# Altium PCB EEM_FMC_Carrier.PcbDoc (part 9 of 19)
Units mm, origin at the board's own origin, x right, y up, seen from the top; angles counter-clockwise.
Board outline 222.9 x 100 mm, 6 copper layers (TopLayer, MidLayer1, MidLayer2, SignalLayer1, Internal Plane 1, BottomLayer), stack 1.528 mm thick; 790 components, 743 nets, 3570 pads, 2277 vias.
Unrouted connection lines stored in the file: 3.
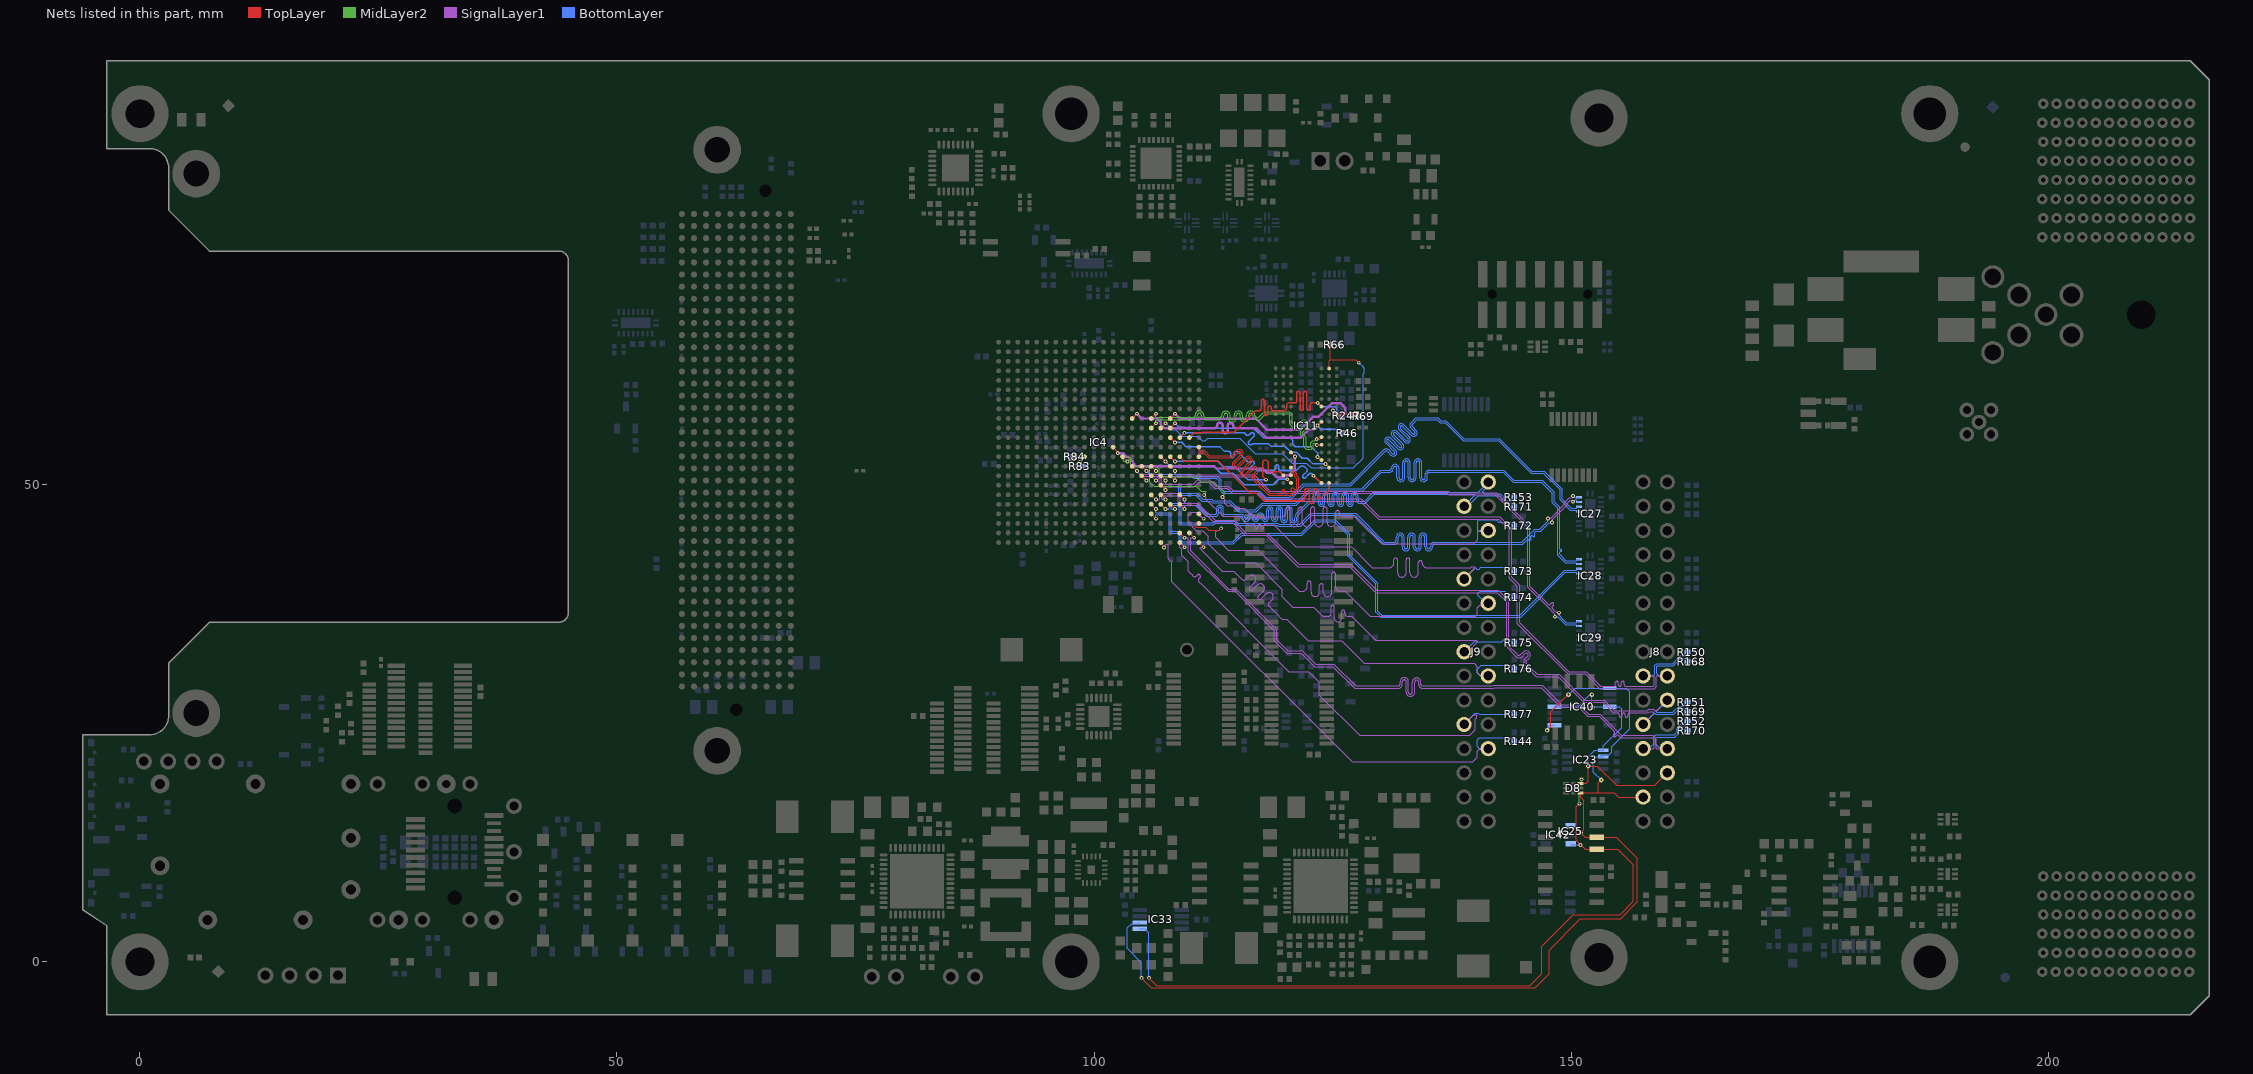
[diagram p11: the nets of this part, all layers, seen from the top]

## Via types
v1: diameter 0.4, hole 0.2, TopLayer to BottomLayer, tented both sides, 1032 vias
v2: diameter 0.5, hole 0.2, TopLayer to BottomLayer, tented both sides, 979 vias
v3: diameter 0.5, hole 0.2, TopLayer to BottomLayer, 162 vias
v4: diameter 0.8, hole 0.5, TopLayer to BottomLayer, tented both sides, 102 vias
v5: diameter 0.6, hole 0.3, TopLayer to BottomLayer, tented both sides, 2 vias

## Nets (pads, with @x,y where several pads share a name; then routed paths per layer and width w, separated by ;. In a path a pad name is that pad's centre, name@x,y a point inside that pad or via, vN(x,y) a via of type N, cw(c..) or ccw(c..) an arc to the next point about the centre after c; other vN are vias at no path point) (continued)
DDR3_DQ11: IC4.L20 IC11.C2 | length 19.1
  TopLayer w0.16: IC4.L20@108.998,54.95 v1(109.498,55.45) ; v1(124.251,52.185) 124.263,52.185 IC11.C2@124.648,51.8
  BottomLayer w0.16: v1(109.498,55.45) 114.9,55.45 115.75,55.45 115.951,55.249 ccw(c116.113,55.412) 116.276,55.249 116.428,55.401 cw(c116.59,55.238) 116.753,55.401 cw(c116.59,55.238) 116.753,55.075 116.251,54.574 ccw(c116.414,54.411) 116.251,54.249 ccw(c116.414,54.411) 116.577,54.249 cw(c116.794,53.922) 116.817,54.314 117.039,54.301 ccw(c117.063,54.693) 117.063,54.3 117.657,54.3 118.292,54.3 118.54,54.051 119.997,54.051 120.623,53.425 121.198,53.425 121.83,52.793 122.357,52.793 122.965,52.185 v1(124.251,52.185)
DDR3_DQ12: IC4.N18 IC11.A7 | length 15.3
  TopLayer w0.16: IC4.N18@106.998,52.95 v1(107.498,52.45) ; v1@120.263,50.585 IC11.A7@120.648,50.2
  BottomLayer w0.16: v1(107.498,52.45) 108.072,51.876 112.622,51.876 113.291,51.207 114.566,51.207 115.773,50 118.773,50 119.358,50.585 v1(120.251,50.585)
DDR3_DQ13: IC4.N20 IC11.A2 | length 23.2
  TopLayer w0.16: IC4.N20@108.998,52.95 109.498,52.45 113.075,52.45 116.425,49.1 117.125,49.1 117.9,48.325 121.775,48.325 121.855,48.325 ccw(c121.855,48.555) 122.085,48.555 122.085,49.383 cw(c122.315,49.383) 122.545,49.383 122.545,48.269 ccw(c122.775,48.269) 123.005,48.269 123.005,49.337 cw(c123.235,49.337) 123.465,49.337 123.465,48.82 ccw(c123.695,48.82) 123.858,48.658 124.3,49.1 124.648,49.448 IC11.A2@124.648,50.2
DDR3_DQ14: IC4.N19 IC11.B8 | length 16.4
  TopLayer w0.16: IC4.N19@107.998,52.95 v1(108.498,52.45) ; v1(118.033,50.538) 117.7,50.871 117.7,52.456 117.794,52.55 118.125,52.55 118.2,52.475 118.249,52.426 118.249,51.576 118.456,51.369 119.479,51.369 IC11.B8@119.848,51
  BottomLayer w0.16: v1(108.498,52.45) 112.973,52.45 113.548,51.875 114.798,51.875 116.135,50.538 v1(118.033,50.538)
DDR3_DQ15: IC4.L19 IC11.A3 | length 22.7
  TopLayer w0.16: IC4.L19@107.998,54.95 v1(108.498,54.45) ; v1(123.023,50.95) 123.659,50.314 123.669,50.314 123.783,50.2 IC11.A3@123.848,50.2
  BottomLayer w0.16: v1(108.498,54.45) 109.198,54.45 109.681,53.967 113.206,53.967 113.673,53.5 113.703,53.5 114.143,53.5 cw(c114.143,53.32) 114.323,53.32 114.323,53.035 ccw(c114.503,53.035) 114.683,53.035 114.683,53.32 cw(c114.863,53.32) 114.863,53.5 115.048,53.5 115.147,53.401 116.127,52.421 116.183,52.365 ccw(c116.311,52.492) 116.438,52.365 116.503,52.43 cw(c116.63,52.303) 116.758,52.43 cw(c116.63,52.303) 116.758,52.175 116.438,51.856 ccw(c116.565,51.728) 116.438,51.601 ccw(c116.565,51.728) 116.692,51.601 cw(c116.82,51.474) 116.947,51.601 117.048,51.5 117.226,51.5 118.75,51.5 118.83,51.5 ccw(c118.83,51.68) 119.01,51.68 119.01,51.908 cw(c119.19,51.908) 119.37,51.908 119.37,51.68 ccw(c119.55,51.68) 119.55,51.5 120.105,51.5 121.2,51.5 121.625,51.925 121.955,51.925 122.048,51.925 122.313,51.66 cw(c122.185,51.533) 122.313,51.406 121.918,51.011 ccw(c122.045,50.883) 121.918,50.756 ccw(c122.045,50.883) 122.172,50.756 122.567,51.151 cw(c122.695,51.024) 122.822,51.151 v1(123.023,50.95)
DDR3_LDM: IC4.M13 IC11.E7 | length 22.8
  TopLayer w0.16: IC4.M13@101.998,53.95 102.444,53.504 102.444,53.385 v1(102.489,53.34) ; IC11.E7@120.648,53.4 v1(121.073,52.975)
  SignalLayer1 w0.26: v1(102.489,53.34) 102.514,53.315 103.053,53.315 103.423,52.945 103.583,52.945 104.088,52.44 104.088,52.28 104.418,51.95 112.598,51.95 112.838,51.71 115.923,51.71 117.675,51.71 118.141,51.244 118.686,51.244 119.13,50.8 119.886,50.8 120.082,50.995 120.363,50.995 121.048,51.68 121.048,52.95 v1(121.073,52.975)
DDR3_LDQS_N: IC4.J17 IC11.G3 | length 27.9
  TopLayer w0.085: IC4.J17@105.998,56.95 v1(106.498,57.45) ; v1(123.349,54.798) 123.646,54.798 IC11.G3@123.848,55
  MidLayer2 w0.11: v1(106.498,57.45) 106.498,57.133 106.562,57.069 110.225,57.069 110.399,57.069 ccw(c110.399,57.274) 110.604,57.274 110.604,57.304 cw(c111.046,57.304) 111.046,57.746 cw(c111.046,57.304) 111.488,57.304 111.488,57.274 ccw(c111.693,57.274) 111.693,57.069 112.4,57.069 113.012,57.069 113.185,57.069 ccw(c113.185,57.274) 113.39,57.274 113.39,57.285 cw(c113.832,57.285) 113.832,57.727 cw(c113.832,57.285) 114.274,57.285 114.274,57.033 ccw(c114.479,57.033) 114.479,56.828 ccw(c114.479,57.033) 114.684,57.033 114.684,57.285 cw(c115.126,57.285) 115.126,57.727 cw(c115.126,57.285) 115.568,57.285 115.568,57.033 ccw(c115.773,57.033) 115.773,56.828 ccw(c115.773,57.033) 115.978,57.033 115.978,57.299 cw(c116.42,57.299) 116.42,57.741 cw(c116.42,57.299) 116.862,57.299 116.862,57.274 ccw(c117.067,57.274) 117.067,57.069 117.269,57.069 117.783,57.583 117.862,57.662 120.448,57.662 120.762,57.348 120.762,56.491 120.786,56.467 120.786,56.414 120.875,56.325 120.963,56.237 120.998,56.202 ccw(c121.143,56.347) 121.288,56.202 121.728,56.643 cw(c122.04,56.33) 122.353,56.643 cw(c122.04,56.33) 122.353,56.017 121.913,55.577 ccw(c122.058,55.432) 121.913,55.287 122.22,54.98 122.237,54.963 122.237,54.822 122.237,54.075 122.337,53.975 122.675,53.975 122.739,54.039 122.739,54.403 122.943,54.607 123.139,54.607 123.33,54.798 v1(123.349,54.798)
DDR3_LDQS_P: IC4.K17 IC11.F3 | length 27.9
  TopLayer w0.085: IC4.K17@105.998,55.95 v1(106.498,56.45) ; v1(123.353,54.178) 123.375,54.2 IC11.F3@123.848,54.2
  MidLayer2 w0.11: v1(106.498,56.45) 106.498,56.767 106.562,56.832 110.225,56.832 110.399,56.832 ccw(c110.399,57.274) 110.841,57.274 110.841,57.304 cw(c111.046,57.304) 111.046,57.509 cw(c111.046,57.304) 111.251,57.304 111.251,57.274 ccw(c111.693,57.274) 111.693,56.832 112.4,56.832 113.012,56.832 113.185,56.832 ccw(c113.185,57.274) 113.627,57.274 113.627,57.285 cw(c113.832,57.285) 113.832,57.49 cw(c113.832,57.285) 114.037,57.285 114.037,57.033 ccw(c114.479,57.033) 114.479,56.591 ccw(c114.479,57.033) 114.921,57.033 114.921,57.285 cw(c115.126,57.285) 115.126,57.49 cw(c115.126,57.285) 115.331,57.285 115.331,57.033 ccw(c115.773,57.033) 115.773,56.591 ccw(c115.773,57.033) 116.215,57.033 116.215,57.299 cw(c116.42,57.299) 116.42,57.504 cw(c116.42,57.299) 116.625,57.299 116.625,57.274 ccw(c117.067,57.274) 117.067,56.832 117.367,56.832 117.783,57.248 117.96,57.425 120.35,57.425 120.525,57.25 120.525,56.393 120.549,56.369 120.549,56.316 120.707,56.157 120.795,56.069 120.83,56.035 ccw(c121.143,56.347) 121.455,56.035 121.895,56.475 cw(c122.04,56.33) 122.185,56.475 cw(c122.04,56.33) 122.185,56.185 121.745,55.745 ccw(c122.058,55.432) 121.745,55.12 122,54.865 122,54.585 122,53.977 122.239,53.738 122.773,53.738 122.976,53.941 122.976,54.305 123.041,54.37 123.143,54.37 123.335,54.178 v1(123.353,54.178)
DDR3_ODT: IC4.J19 IC11.K1 R69.2 | length 25.8
  TopLayer w0.16: IC4.J19@107.998,56.95 v1(108.498,57.45) ; v1@125.063,57.785 IC11.K1@125.448,57.4 127.578,57.4 R69.2@127.778,57.2
  SignalLayer1 w0.26: v1(108.498,57.45) 109.023,56.925 116.973,56.925 118.149,55.749 121.612,55.749 122.975,57.113 123.509,57.113 124.921,58.525 125.879,58.525 126.314,58.09 126.314,57.455 125.959,57.1 125.737,57.1 v1(125.051,57.785)
DDR3_RAS_N: IC4.J15 IC11.J3 R46.1 | length 27.3
  TopLayer w0.16: IC4.J15@103.998,56.95 v1(104.498,57.45) ; v1(123.423,56.2) 123.448,56.2 IC11.J3@123.848,56.6
  SignalLayer1 w0.26: v1(104.498,57.45) 104.998,56.95 106.598,56.95 106.998,56.55 106.998,56.325 107.398,55.925 112.5,55.925 112.63,55.925 ccw(c112.63,56.205) 112.91,56.205 112.91,56.244 cw(c113.19,56.244) 113.47,56.244 113.47,55.689 ccw(c113.75,55.689) 114.03,55.689 114.03,56.205 cw(c114.31,56.205) 114.59,56.205 ccw(c114.87,56.205) 114.87,55.925 115.328,55.925 117.05,55.925 118.06,54.915 121.333,54.915 121.353,54.935 121.671,54.935 122.48,55.744 122.967,55.744 123.419,56.196 v1@123.419,56.236
  BottomLayer w0.16: v1(123.423,56.2) 123.823,55.8 125.678,55.8 125.826,55.652 125.846,55.652 126.053,55.445 R46.1@126.053,55.425
DDR3_RESET_N: IC4.K18 IC11.T2 R66.2 | length 39.9
  TopLayer w0.125: IC4.K18@106.998,55.95 v1(107.498,56.45) ; IC11.T2@124.648,62.2 124.648,62.982 124.778,63.112 ; R66.2@124.778,64.7 124.778,63.112 ; v1(127.748,62.8) 127.436,63.112 124.778,63.112
  BottomLayer w0.125: v1(107.498,56.45) 108.186,55.763 108.56,55.763 109.248,55.075 110.876,55.075 111.352,54.599 111.644,54.599 111.92,54.875 115.298,54.875 116.909,53.264 119.809,53.264 120.797,52.277 122.272,52.277 122.773,51.775 127.187,51.775 128.198,52.786 128.198,61.62 128.325,61.747 128.325,62.203 128.198,62.33 128.198,62.35 v1(127.748,62.8)
DDR3_UDM: IC4.K19 IC11.D3 | length 18.1
  TopLayer w0.16: IC4.K19@107.998,55.95 v1(108.498,56.45) ; v1(123.438,52.908) 123.489,52.908 123.797,52.6 IC11.D3@123.848,52.6
  BottomLayer w0.16: v1(108.498,56.45) 108.898,56.05 109.575,56.05 109.7,55.925 112.498,55.925 116.75,55.925 117.76,54.915 120.56,54.915 120.85,54.625 120.85,54.25 121.1,54 122.775,54 123.438,53.337 v1(123.438,52.908)
DDR3_UDQS_N: IC4.M22 IC11.B7 | length 23.7
  TopLayer w0.085: IC4.M22@110.998,53.95 110.998,53.606 111.048,53.556 111.594,53.556 112.101,53.049 114.149,53.049 114.252,53.049 ccw(c114.253,53.452) 114.538,53.167 114.978,53.607 114.982,53.607 cw(c115.233,53.29) 115.519,53.576 cw(c115.233,53.29) 115.52,53.005 114.762,52.247 ; 114.761,52.246 ccw(c114.897,52.11) 114.761,51.974 ccw(c114.897,52.11) 115.033,51.974 115.958,52.898 115.962,52.898 cw(c116.213,52.581) 116.499,52.867 cw(c116.213,52.581) 116.5,52.296 115.606,51.402 ; 115.606,51.402 ccw(c115.742,51.266) 115.605,51.129 ccw(c115.742,51.266) 115.878,51.129 116.537,51.788 cw(c116.823,51.502) 117.109,51.788 cw(c116.823,51.502) 117.11,51.217 116.832,50.94 ccw(c116.968,50.804) 116.832,50.668 117.103,50.397 117.177,50.323 118.4,49.1 119.525,49.1 119.568,49.1 ccw(c119.568,49.242) 119.71,49.242 119.71,49.349 cw(c119.853,49.349) 119.853,49.492 cw(c119.853,49.349) 119.995,49.349 119.995,49.242 ccw(c120.138,49.242) 120.138,49.1 120.394,49.1 120.525,49.1 120.75,49.1 120.768,49.118 ccw(c120.668,49.219) 120.768,49.32 120.669,49.42 cw(c120.769,49.52) 120.669,49.621 cw(c120.769,49.52) 120.87,49.621 120.97,49.521 ccw(c121.071,49.622) 121.171,49.521 121.25,49.6 121.25,49.74 121.25,50.648 121.061,50.838 121.061,51.056 120.823,51.294 120.752,51.294 120.702,51.244 120.702,51.054 IC11.B7@120.648,51
DDR3_UDQS_P: IC4.N22 IC11.C7 | length 23.2
  TopLayer w0.085: IC4.N22@110.998,52.95 110.998,53.294 111.048,53.344 111.506,53.344 112.013,52.837 113.937,52.837 114.252,52.837 ccw(c114.253,53.452) 114.687,53.016 115.096,53.425 ; 115.097,53.426 cw(c115.233,53.29) 115.369,53.426 cw(c115.233,53.29) 115.369,53.153 114.58,52.365 114.58,52.361 ccw(c114.897,52.11) 114.611,51.824 ccw(c114.897,52.11) 115.183,51.824 ; 115.183,51.824 116.076,52.716 ; 116.077,52.717 cw(c116.213,52.581) 116.349,52.717 cw(c116.213,52.581) 116.349,52.445 115.425,51.521 115.425,51.517 ccw(c115.742,51.266) 116.028,50.98 116.686,51.638 cw(c116.823,51.502) 116.959,51.638 cw(c116.823,51.502) 116.959,51.366 116.682,51.09 ccw(c116.968,50.804) 116.683,50.517 ; 116.683,50.517 116.953,50.247 117.027,50.173 118.312,48.888 120.838,48.888 121.462,49.512 121.462,50.736 121.273,50.925 121.273,51.144 120.91,51.506 120.752,51.506 120.702,51.556 120.702,51.746 IC11.C7@120.648,51.8
DDR3_WE_N: IC4.L21 IC11.L3 R247.1 | length 29.9
  TopLayer w0.16: IC4.L21@109.998,54.95 110.498,55.45 111.3,55.45 111.378,55.528 114.703,55.528 116.95,57.775 117.25,57.775 117.33,57.775 ccw(c117.33,57.955) 117.51,57.955 117.51,58.784 cw(c117.69,58.784) 117.87,58.784 117.87,57.444 ccw(c118.05,57.444) 118.23,57.444 118.23,58.076 cw(c118.41,58.076) 118.59,58.076 118.59,57.955 ccw(c118.77,57.955) 118.77,57.775 119.041,57.775 120.025,57.775 120.175,57.925 120.175,58.005 120.217,58.047 120.217,58.458 120.344,58.585 120.975,58.585 121.055,58.585 ccw(c121.055,58.765) 121.235,58.765 121.235,59.617 cw(c121.415,59.617) 121.595,59.617 121.595,57.984 ccw(c121.775,57.984) 121.955,57.984 121.955,59.617 cw(c122.135,59.617) 122.315,59.617 122.315,58.003 ccw(c122.495,58.003) 122.675,58.003 122.675,58.405 cw(c122.855,58.405) 122.855,58.585 123.264,58.585 v1(123.451,58.585) 123.457,58.585 123.842,58.2 IC11.L3@123.848,58.2
  BottomLayer w0.16: v1(123.451,58.585) 123.862,58.175 125.273,58.175 125.423,58.025 125.423,57.94 ; 125.424,57.94 125.424,57.874 126.028,57.27 R247.1@126.028,57.25
DXN_0: IC4.N9 R84.2 | length 1.3
  TopLayer w0.125: v1(97.498,52.45) IC4.N9@97.998,52.95
  BottomLayer w0.125: v1(97.498,52.45) 97.501,52.453 97.501,52.802 97.648,52.95 R84.2@97.668,52.95
DXP_0: IC4.N10 R83.2 | length 1.3
  TopLayer w0.125: v1(98.547,52.426) 98.547,52.462 98.998,52.913 IC4.N10@98.998,52.95
  BottomLayer w0.125: v1(98.547,52.426) 98.547,52.351 98.66,52.238 98.66,52.098 98.808,51.95 R83.2@98.828,51.95
EEM0_I2C.SCL: D8.1 IC23.6 IC25.6 IC33.2 IC40.1 IC40.8 IC42.1 J8.27 | length 115.6
  TopLayer w0.125: v1(104.975,-1.675) 106.024,-2.724 146.251,-2.724 147.7,-1.275 147.7,1.225 150.988,4.513 155.188,4.513 156.95,6.275 156.95,10.85 154.735,13.065 IC25.6@152.698,13.065 152.665,13.032 151.503,13.032 151.048,13.487 v1(151.048,13.537) 151.357,13.846 151.357,16.875 151.008,17.224 D8.1@151.008,17.7 152.873,17.7 ; v2(147.5,24.263) 147.513,24.263 147.883,24.633 147.883,26.201 149.682,28 v2(149.75,28) ; v2(153.171,19.071) 152.878,18.778 152.878,18.595 152.873,18.589 152.873,17.7 ; J8.27@157.544,17.228 154.997,17.228 154.525,17.7 152.873,17.7
  BottomLayer w0.125: IC33.2@104.798,4.125 104.664,3.991 103.941,3.991 103.5,3.55 103.5,1.398 104.975,-0.077 v1(104.975,-1.675) ; v2(147.5,24.263) 147.5,24.351 147.592,24.443 147.592,24.634 147.754,24.796 IC40.8@148.254,24.796 ; v2(149.75,28) 150.446,28.696 IC40.1@154.054,28.696 155.758,28.696 156.133,28.321 156.133,24.433 154.25,22.55 154.25,21.952 153.961,21.662 153.185,21.662 IC23.6@153.032,21.509 ; IC42.1@149.95,14.275 150.187,14.038 150.547,14.038 v1(151.048,13.537) ; v2(153.171,19.071) 152.35,19.893 152.35,21.275 152.584,21.509 IC23.6@153.032,21.509 ; IC23.6@153.398,21.525 153.382,21.509 IC23.6@153.032,21.509
EEM0_I2C.SDA: D8.3 IC23.5 IC25.5 IC33.1 IC40.4 IC40.11 IC42.3 J8.26 | length 110.3
  TopLayer w0.125: v1(105.75,-1.675) 106.575,-2.5 145.7,-2.5 146.925,-1.275 146.925,1.625 150.25,4.95 155.15,4.95 156.525,6.325 156.525,10.173 154.922,11.775 IC25.5@152.726,11.775 ; v1(150.875,16.575) 150.573,16.273 150.573,12.722 v1@150.96,12.335 ; D8.3@151.008,18.7 151.161,18.7 151.1,18.76 v1(151.1,19.128) ; v1@151.022,12.273 151.5,11.795 IC25.5@152.698,11.795 ; D8.3@151.172,18.696 151.571,18.696 151.8,18.925 v2(151.8,20.525) 152.75,20.525 154.775,18.5 158.791,18.5 J8.26@160.098,19.807 ; v2(152.183,28) 152.183,26.718 v2(152.237,26.664)
  MidLayer2 w0.125: v1(150.875,16.575) 150.875,18.155 151.094,18.374 v1@151.094,19.122
  BottomLayer w0.125: IC33.1@104.798,3.475 105.323,3.475 105.485,3.313 105.485,3.29 105.75,3.025 v1(105.75,-1.675) ; IC40.11@148.254,26.746 150.746,26.746 151.928,27.928 152.111,27.928 v2(152.183,28) ; IC42.3@149.95,12.375 150.075,12.25 v1(151,12.25) ; v2(151.8,20.525) 151.8,21.475 152.5,22.175 IC23.5@153.398,22.175 153.398,22.623 155.295,24.52 155.295,26.505 155.054,26.746 IC40.4@154.054,26.746 154.051,26.75 152.51,26.75 152.496,26.736 152.309,26.736 v2(152.237,26.664)
EEM_IO.LVDS_N0: IC4.V19 IC27.18 | length 58.9
  TopLayer w0.085: IC4.V19@107.998,47.95 v1(108.498,47.45)
  SignalLayer1 w0.11: v1(147.998,46.05) 148.018,46.07 148.018,46.326 149.587,47.896 149.587,48.059 149.922,48.394 150.014,48.394 150.183,48.225 v1(150.223,48.225)
  BottomLayer w0.085: v1(108.498,47.45) 108.154,47.45 108.104,47.5 108.104,47.636 108.318,47.85 108.7,47.85 108.913,47.637 108.913,46.062 109.175,45.8 112.55,45.8 112.725,45.975 114.825,45.975 115.019,45.782 119.194,45.782 119.337,45.638 121.663,45.638 122.825,46.8 127.325,46.8 130.35,43.775 131.35,43.775 131.499,43.775 ccw(c131.499,44.18) 131.903,44.18 131.903,44.518 cw(c132.096,44.518) 132.096,44.711 cw(c132.096,44.518) 132.288,44.518 132.288,43.481 ccw(c132.693,43.481) 132.693,43.077 ccw(c132.693,43.481) 133.097,43.481 133.097,44.518 cw(c133.29,44.518) 133.29,44.711 cw(c133.29,44.518) 133.482,44.518 133.482,43.481 ccw(c133.887,43.481) 133.887,43.077 ccw(c133.887,43.481) 134.291,43.481 134.291,44.518 cw(c134.484,44.518) 134.484,44.711 cw(c134.484,44.518) 134.676,44.518 134.676,43.497 ccw(c135.081,43.497) 135.081,43.092 ccw(c135.081,43.497) 135.485,43.497 135.485,43.583 cw(c135.678,43.583) 135.678,43.775 136.455,43.775 144.937,43.775 145.142,43.98 145.373,44.211 cw(c145.474,44.111) 145.575,44.211 145.585,44.201 ccw(c145.686,44.302) 145.786,44.201 ccw(c145.686,44.302) 145.786,44.403 145.776,44.413 cw(c145.877,44.514) 145.776,44.614 cw(c145.877,44.514) 145.978,44.614 ccw(c146.079,44.715) 146.179,44.614 ccw(c146.079,44.715) 146.179,44.816 cw(c146.28,44.917) 146.179,45.017 146.3,45.138 146.337,45.138 146.812,45.138 147.611,45.938 147.72,46.047 147.995,46.047 v1(147.998,46.05) ; v1(150.223,48.225) 150.228,48.225 150.422,48.419 150.498,48.419 150.59,48.326 150.59,48.282 150.673,48.2 IC27.18@150.848,48.2
EEM_IO.LVDS_N1: IC4.R17 IC27.16 | length 67.1
  TopLayer w0.085: IC4.R17@105.998,50.95 v1(106.498,50.45)
  BottomLayer w0.085: v1(106.498,50.45) 106.108,50.84 106.108,50.91 106.158,50.96 106.228,50.96 106.31,50.878 110.247,50.878 110.275,50.85 110.375,50.75 110.437,50.688 112.837,50.688 113.113,50.412 113.113,49.524 113.506,49.132 117.269,49.132 117.912,48.488 120.613,48.488 122.038,49.913 126.938,49.913 130.066,53.041 130.534,53.509 cw(c130.634,53.408) 130.735,53.509 131.126,53.118 ccw(c131.376,53.369) 131.627,53.118 ; 131.618,55.437 132.565,54.49 ccw(c132.817,54.74) 133.068,54.489 ; 131.618,55.437 ccw(c131.517,55.337) 131.416,55.438 ccw(c131.517,55.337) 131.416,55.236 132.396,54.256 132.396,54.252 cw(c132.114,54.037) 132.366,53.787 ; 131.628,53.119 ccw(c131.376,53.369) 131.627,53.619 131.152,54.094 130.713,54.533 cw(c130.814,54.634) 130.713,54.735 cw(c130.814,54.634) 130.915,54.735 131.863,53.787 ccw(c132.114,54.037) 132.365,53.786 ; 132.32,56.14 ccw(c132.22,56.04) 132.119,56.14 ccw(c132.22,56.04) 132.119,55.939 133.099,54.959 133.099,54.955 cw(c132.817,54.74) 133.068,54.49 ; 132.321,56.14 133.268,55.192 ccw(c133.52,55.442) 133.77,55.192 ; 133.771,55.193 ccw(c133.52,55.442) 133.801,55.658 133.801,55.662 133.345,56.118 cw(c133.446,56.219) 133.345,56.32 133.45,56.425 133.838,56.813 135.987,56.813 136.275,56.525 136.8,56.525 137.625,55.7 138.687,54.638 142.4,54.638 145.819,51.219 147.106,51.219 148.863,49.462 148.863,48.418 149.937,47.344 150.541,47.344 150.59,47.294 150.59,47.282 150.673,47.2 IC27.16@150.848,47.2
EEM_IO.LVDS_N2: IC4.T18 IC28.18 | length 65.1
  TopLayer w0.085: IC4.T18@106.998,49.95 v1(107.498,49.45)
  BottomLayer w0.085: v1(107.498,49.45) 107.498,49.794 107.548,49.844 108.694,49.844 108.888,49.65 108.888,49.137 109.119,48.906 110.669,48.906 111.294,48.282 112.244,48.282 112.4,48.125 114.2,48.125 115.162,47.163 117.013,47.163 117.713,47.863 121.213,47.863 122.725,49.375 128.175,49.375 129.99,51.19 130.129,51.329 130.968,51.329 ccw(c130.968,51.733) 131.372,51.733 cw(c131.565,51.733) 131.565,51.926 cw(c131.565,51.733) 131.757,51.733 131.757,50.739 ccw(c132.162,50.739) 132.162,50.334 ccw(c132.162,50.739) 132.566,50.739 132.566,52.306 cw(c132.759,52.306) 132.759,52.498 cw(c132.759,52.306) 132.951,52.306 132.951,50.739 ccw(c133.356,50.739) 133.356,50.334 ccw(c133.356,50.739) 133.76,50.739 133.76,52.306 cw(c133.953,52.306) 133.953,52.498 cw(c133.953,52.306) 134.145,52.306 134.145,50.739 ccw(c134.55,50.739) 134.55,50.334 ccw(c134.55,50.739) 134.954,50.739 134.954,51.136 cw(c135.147,51.136) 135.147,51.329 135.295,51.329 142.872,51.329 143.925,50.275 146.888,50.275 148.038,49.125 148.038,48.112 148.613,47.537 148.613,42.612 149.381,41.844 150.541,41.844 150.59,41.794 150.59,41.782 150.673,41.7 IC28.18@150.848,41.7
EEM_IO.LVDS_N3: IC4.W17 IC28.16 | length 58.1
  TopLayer w0.085: IC4.W17@105.998,46.95 v1(106.498,46.45)
  BottomLayer w0.085: v1(106.498,46.45) 106.498,46.794 106.548,46.844 107.731,46.844 107.863,46.712 107.863,45.187 108.144,44.906 108.719,44.906 108.954,44.671 108.954,44.096 109.237,43.813 114.613,43.813 115.513,44.713 121.788,44.713 123.225,46.15 125.2,46.15 126.6,44.75 126.6,42.54 129.534,39.606 129.534,36.667 129.675,36.525 130.062,36.138 144.713,36.138 149.419,40.844 150.541,40.844 150.59,40.794 150.59,40.782 150.673,40.7 IC28.16@150.848,40.7
EEM_IO.LVDS_N4: IC4.R19 IC29.18 | length 53.7
  TopLayer w0.085: IC4.R19@107.998,50.95 v1(108.498,50.45)
  SignalLayer1 w0.11: v1(108.498,50.45) 108.498,50.767 108.562,50.831 110.198,50.831 112.498,50.831 116.683,50.831 118.402,49.113 129.448,49.113 137.027,49.113 137.196,48.944 142.081,48.944 145.463,45.562 145.463,39.287 147.5,37.25 148.301,36.449 148.301,36.193 v1(148.321,36.173)
  BottomLayer w0.085: v1(148.321,36.173) 148.324,36.17 148.599,36.17 148.884,35.884 149.009,35.759 149.424,35.344 150.541,35.344 150.59,35.294 150.59,35.282 150.673,35.2 IC29.18@150.848,35.2
EEM_IO.LVDS_N5: IC4.R16 J8.18 R168.2 | length 78.2
  TopLayer w0.085: IC4.R16@104.998,50.95 v1(105.498,50.45)
  SignalLayer1 w0.11: v1(105.498,50.45) 105.222,50.726 105.222,50.818 105.286,50.882 106.556,50.882 106.829,50.609 106.829,50.186 107.202,49.813 110.488,49.813 110.956,50.281 112.007,50.281 112.663,49.625 113.99,49.625 114.49,49.125 117.015,49.125 117.84,48.3 127.925,48.3 129.821,46.404 142.421,46.404 143.55,45.275 143.55,40.19 144.388,39.352 144.388,35.427 149.64,30.175 151.49,30.175 153.027,28.638 154.45,28.638 156.154,28.638 158.743,28.638 158.947,28.841 158.947,29.903 159.011,29.967 J8.18@160.098,29.967
  BottomLayer w0.085: J8.18@160.098,29.967 159.208,29.967 159,30.175 159,30.975 159.063,31.038 160.738,31.038 161.544,31.844 161.913,31.844 161.963,31.794 161.963,31.697 R168.2@162.21,31.45
EEM_IO.LVDS_N6: IC4.U18 J8.21 R169.2 | length 75.9
  TopLayer w0.085: IC4.U18@106.998,48.95 v1(107.498,48.45)
  SignalLayer1 w0.11: v1(107.498,48.45) 107.181,48.45 107.117,48.514 107.117,48.699 107.293,48.875 108.65,48.875 108.829,48.696 108.829,48.053 109.032,47.85 110.765,47.85 112.59,46.025 114.54,46.025 115.865,44.7 118.065,44.7 121.34,41.425 126.825,41.425 129.55,38.7 142.275,38.7 143.238,37.737 143.238,33.002 144.12,32.12 144.208,32.032 144.243,31.997 ccw(c144.555,32.31) 144.868,31.997 145.168,32.298 cw(c145.312,32.152) 145.457,32.297 cw(c145.312,32.152) 145.457,32.007 145.158,31.707 ccw(c145.47,31.395) 145.158,31.082 145.582,30.658 145.67,30.57 146.352,29.888 ; 146.282,29.957 146.352,29.888 ; J8.21@157.558,24.887 158.659,25.988 158.659,26.159 158.594,26.223 158.252,26.223 158.114,26.085 156.825,26.085 156.135,26.085 ccw(c156.135,25.93) 155.98,25.93 155.98,25.78 cw(c155.825,25.78) 155.825,25.625 cw(c155.825,25.78) 155.67,25.78 155.67,25.93 ccw(c155.515,25.93) 155.515,26.085 ccw(c155.515,25.93) 155.36,25.93 155.36,25.778 cw(c155.205,25.778) 155.205,25.623 cw(c155.205,25.778) 155.05,25.778 155.05,25.93 ccw(c154.895,25.93) 154.895,26.085 154.465,26.085 154.375,26.175 153.362,27.188 151.352,27.188 148.652,29.888 146.352,29.888
  BottomLayer w0.085: J8.21@157.558,24.887 158.718,26.047 158.788,26.047 158.9,25.935 160.76,25.935 161.419,26.594 161.836,26.594 162.21,26.22 R169.2@162.21,26.2
EEM_IO.LVDS_N7: IC4.AA21 J8.24 R170.2 | length 72.7
  TopLayer w0.085: IC4.AA21@109.998,44.95 v1(110.498,44.45)
  SignalLayer1 w0.11: v1(110.498,44.45) 110.181,44.45 110.116,44.386 110.116,43.096 114.15,39.062 114.911,39.062 119.15,34.823 119.15,33.775 120.325,32.6 121.812,32.6 123.225,31.187 125.148,31.187 127.424,28.911 131.7,28.911 131.874,28.911 ccw(c131.874,29.116) 132.079,29.116 132.079,29.344 cw(c132.521,29.344) 132.521,29.786 cw(c132.521,29.344) 132.963,29.344 132.963,28.257 ccw(c133.168,28.257) 133.168,28.052 ccw(c133.168,28.257) 133.373,28.257 133.373,29.327 cw(c133.814,29.327) 133.814,29.769 cw(c133.815,29.327) 134.256,29.327 134.256,29.116 ccw(c134.461,29.116) 134.461,28.911 135.021,28.911 141.765,28.911 141.829,28.975 146.975,28.975 149.03,26.92 150.905,26.92 151.863,25.962 153.063,25.962 155.277,23.748 158.552,23.748 158.947,23.353 158.947,22.411 159.011,22.347 J8.24@160.098,22.347
  BottomLayer w0.085: J8.24@160.098,22.347 159.94,22.505 159.22,22.505 158.9,22.825 158.9,23.488 158.975,23.563 160.888,23.563 161.29,23.965 161.29,24.375 161.636,24.721 161.913,24.721 161.963,24.671 161.963,24.447 R170.2@162.21,24.2
EEM_IO.LVDS_N8: IC4.V20 J9.3 R171.2 | length 61
  TopLayer w0.085: IC4.V20@108.998,47.95 v1(109.498,47.45)
  BottomLayer w0.085: v1(109.498,47.45) 109.498,47.794 109.548,47.844 110.631,47.844 111.787,46.688 112.55,46.688 112.699,46.688 ccw(c112.699,47.042) 113.053,47.042 113.053,47.514 cw(c113.196,47.514) 113.196,47.657 cw(c113.196,47.514) 113.338,47.514 113.338,47.042 ccw(c113.693,47.042) 113.693,46.688 114.825,46.688 114.893,46.688 115.456,46.688 cw(c115.456,46.546) 115.599,46.546 115.599,46.533 ccw(c115.953,46.533) 115.953,46.179 ccw(c115.953,46.533) 116.307,46.533 116.307,46.624 cw(c116.45,46.624) 116.45,46.766 cw(c116.45,46.624) 116.592,46.624 116.592,46.533 ccw(c116.947,46.533) 116.947,46.179 ccw(c116.947,46.533) 117.301,46.533 117.301,46.688 cw(c117.444,46.688) 117.444,46.83 cw(c117.444,46.688) 117.586,46.688 117.586,46.533 ccw(c117.941,46.533) 117.941,46.179 ccw(c117.941,46.533) 118.295,46.533 118.295,47.323 cw(c118.438,47.323) 118.438,47.466 cw(c118.438,47.323) 118.58,47.323 118.58,46.533 ccw(c118.935,46.533) 118.935,46.179 ccw(c118.935,46.533) 119.289,46.533 119.289,47.323 cw(c119.432,47.323) 119.432,47.466 cw(c119.432,47.323) 119.574,47.323 119.574,46.389 ccw(c119.929,46.389) 119.929,46.035 ccw(c119.929,46.389) 120.283,46.389 120.283,47.323 cw(c120.426,47.323) 120.426,47.466 cw(c120.426,47.323) 120.568,47.323 120.568,46.389 ccw(c120.923,46.389) 120.923,46.035 ccw(c120.923,46.389) 121.277,46.389 121.277,46.621 cw(c121.596,46.621) 121.369,46.844 cw(c121.596,46.621) 121.37,46.845 121.444,46.919 122.408,47.883 122.6,48.075 122.86,48.075 ccw(c122.86,48.429) 123.214,48.429 123.214,48.836 cw(c123.357,48.836) 123.357,48.978 cw(c123.357,48.836) 123.499,48.836 123.499,48.098 ccw(c123.854,48.098) 123.854,47.744 ccw(c123.854,48.098) 124.208,48.098 124.208,48.836 cw(c124.351,48.836) 124.351,48.978 cw(c124.351,48.836) 124.493,48.836 124.493,48.098 ccw(c124.848,48.098) 124.848,47.744 ccw(c124.848,48.098) 125.202,48.098 125.202,48.836 cw(c125.345,48.836) 125.345,48.978 cw(c125.345,48.836) 125.487,48.836 125.487,48.098 ccw(c125.842,48.098) 125.842,47.744 ccw(c125.842,48.098) 126.196,48.098 126.196,48.836 cw(c126.339,48.836) 126.339,48.978 cw(c126.339,48.836) 126.481,48.836 126.481,48.098 ccw(c126.836,48.098) 126.836,47.744 ccw(c126.836,48.098) 127.19,48.098 127.19,48.836 cw(c127.333,48.836) 127.333,48.978 cw(c127.333,48.836) 127.475,48.836 127.475,48.429 ccw(c127.83,48.429) 127.83,48.075 128.45,48.075 128.475,48.101 129.375,49 139.872,49 139.922,48.95 139.922,48.88 J9.3@139.078,48.036 ; J9.3@138.788,47.746 J9.3@139.078,48.036 ; R171.2@144.028,47.7 143.78,47.947 143.78,48.044 143.731,48.094 143.112,48.094 142.738,48.468 142.738,48.65 142.513,48.875 140.299,48.875 139.46,48.036 J9.3@139.078,48.036
EEM_IO.LVDS_N9: IC4.P17 J9.6 R172.2 | length 62.6
  TopLayer w0.085: IC4.P17@105.998,51.95 v1(106.498,51.45)
  MidLayer2 w0.11: v1(106.498,51.45) 106.498,51.773 106.562,51.838 106.654,51.838 106.863,51.628 106.863,51.127 107.165,50.825 110.665,50.825 111.165,50.325 112.515,50.325 113.643,49.197 113.643,49.063 113.643,48.934 113.464,48.756 v1(113.464,48.725)
  SignalLayer1 w0.11: v1(113.464,48.725) 113.464,48.694 113.681,48.478 113.681,48.087 113.967,47.801 114.539,47.801 114.777,47.563 115.752,47.563 116.652,46.663 119.525,46.663 119.699,46.663 ccw(c119.699,47.105) 120.141,47.105 120.141,47.475 cw(c120.346,47.475) 120.346,47.68 cw(c120.346,47.475) 120.551,47.475 120.551,46.057 ccw(c120.993,46.057) 120.993,45.615 ccw(c120.993,46.057) 121.435,46.057 121.435,47.475 cw(c121.64,47.475) 121.64,47.68 cw(c121.64,47.475) 121.845,47.475 121.845,46.057 ccw(c122.286,46.057) 122.286,45.615 ccw(c122.286,46.057) 122.728,46.057 122.728,47.475 cw(c122.933,47.475) 122.933,47.68 cw(c122.933,47.475) 123.138,47.475 123.138,46.057 ccw(c123.58,46.057) 123.58,45.615 ccw(c123.58,46.057) 124.022,46.057 124.022,47.475 cw(c124.227,47.475) 124.227,47.68 cw(c124.227,47.475) 124.432,47.475 124.432,46.078 ccw(c124.874,46.078) 124.874,45.636 ccw(c124.874,46.078) 125.316,46.078 125.316,47.105 cw(c125.521,47.105) 125.521,47.31 cw(c125.521,47.105) 125.726,47.105 ccw(c126.168,47.105) 126.168,46.663 127.312,46.663 127.72,46.255 130.149,43.826 139.808,43.826 140.207,44.225 140.207,44.834 140.207,45.142 140.271,45.206 J9.6@141.328,45.206
  BottomLayer w0.085: J9.6@141.328,45.206 140.3,45.206 140.25,45.256 140.25,46.225 140.375,46.35 142.15,46.35 142.406,46.094 143.731,46.094 143.78,46.044 143.78,45.947 R172.2@144.028,45.7
EEM_IO.LVDS_N10: IC4.N14 J9.9 R173.2 | length 61.7
  TopLayer w0.085: IC4.N14@102.998,52.95 v1(103.498,52.45)
  MidLayer2 w0.11: v1(103.498,52.45) 103.114,52.45 103.05,52.514 103.05,52.7 103.225,52.875 103.675,52.875 103.875,52.675 103.875,52.165 104.158,51.882 105.693,51.882 105.863,51.712 105.863,50.282 106.307,49.838 110.731,49.838 111.244,49.325 111.665,49.325 111.729,49.261 111.729,49.127 111.551,48.948 v1(111.551,48.917)
  SignalLayer1 w0.11: v1(111.551,48.917) 111.551,48.886 111.729,48.708 111.729,48.486 113.527,46.688 115.237,46.688 116.087,45.838 116.214,45.838 116.73,45.838 cw(c116.73,45.683) 116.885,45.683 116.885,45.552 ccw(c117.04,45.552) 117.04,45.397 ccw(c117.04,45.552) 117.195,45.552 117.195,45.683 cw(c117.35,45.683) 117.35,45.838 cw(c117.35,45.683) 117.505,45.683 117.505,45.547 ccw(c117.66,45.547) 117.66,45.392 ccw(c117.66,45.547) 117.815,45.547 117.815,45.683 cw(c117.97,45.683) 117.97,45.838 118.025,45.838 118.852,45.838 121.165,43.525 126.965,43.525 127.209,43.281 128.651,41.839 129.166,41.324 130.8,41.324 130.974,41.324 ccw(c130.974,41.766) 131.416,41.766 131.416,42.119 cw(c131.621,42.119) 131.621,42.324 cw(c131.621,42.119) 131.826,42.119 131.826,40.766 ccw(c132.268,40.766) 132.268,40.324 ccw(c132.268,40.766) 132.71,40.766 132.71,42.119 cw(c132.914,42.119) 132.914,42.324 cw(c132.915,42.119) 133.12,42.119 133.12,40.766 ccw(c133.561,40.766) 133.561,40.324 ccw(c133.561,40.766) 134.003,40.766 134.003,41.837 cw(c134.208,41.837) 134.208,42.042 cw(c134.208,41.837) 134.413,41.837 134.413,41.766 ccw(c134.855,41.766) 134.855,41.324 135.476,41.324 139.474,41.324 139.572,41.422 139.864,41.422 139.929,41.358 139.929,41.267 J9.9@138.788,40.126
  BottomLayer w0.085: J9.9@138.788,40.126 139.948,41.286 140.018,41.286 140.13,41.174 140.376,41.174 140.546,41.344 143.447,41.344 143.731,41.344 143.78,41.294 143.78,41.197 R173.2@144.028,40.95
EEM_IO.LVDS_N11: IC4.Y22 J9.12 R174.2 | length 52
  TopLayer w0.085: IC4.Y22@110.998,45.95 110.654,45.95 110.604,45.9 110.604,45.593 110.654,45.543 111.707,45.543 112.013,45.237 113.141,45.237 113.333,45.429 v1(113.333,45.438)
  SignalLayer1 w0.11: v1(113.333,45.438) 113.304,45.438 113.123,45.258 112.949,45.258 112.746,45.054 112.746,44.494 114.09,43.15 117.215,43.15 121.515,38.85 121.721,38.85 121.895,38.85 ccw(c121.895,39.292) 122.337,39.292 122.337,39.703 cw(c122.542,39.703) 122.542,39.908 cw(c122.542,39.703) 122.747,39.703 122.747,38.732 ccw(c123.189,38.732) 123.189,38.29 ccw(c123.189,38.732) 123.631,38.732 123.631,39.427 cw(c123.836,39.427) 123.836,39.632 cw(c123.836,39.427) 124.041,39.427 124.041,38.732 ccw(c124.483,38.732) 124.483,38.29 ccw(c124.483,38.732) 124.925,38.732 124.925,40.637 cw(c125.13,40.637) 125.13,40.842 cw(c125.13,40.637) 125.335,40.637 125.335,39.292 ccw(c125.777,39.292) 125.777,38.85 126.34,38.85 126.831,38.359 128.977,36.213 139.963,36.213 140.177,36.427 140.177,37.125 140.428,37.376 141.118,37.376 J9.12@141.328,37.586
  BottomLayer w0.085: J9.12@141.328,37.586 141.089,37.586 140.25,38.425 140.25,38.613 140.5,38.863 143.068,38.863 143.337,38.594 143.731,38.594 143.78,38.544 143.78,38.447 R174.2@144.028,38.2
EEM_IO.LVDS_N12: IC4.W22 J9.15 R175.2 | length 51.8
  TopLayer w0.085: IC4.W22@110.998,46.95 v1(111.498,46.45)
  SignalLayer1 w0.11: v1(111.498,46.45) 111.42,46.45 111.325,46.545 111.297,46.545 111.116,46.725 111.116,46.916 110.913,47.119 110.209,47.119 109.863,46.773 109.863,46.052 110.727,45.188 111.4,45.188 111.975,44.613 111.975,43.84 114.002,41.813 116.937,41.813 119.725,39.025 119.725,38.277 120.846,37.156 123.009,37.156 123.965,36.2 124.3,36.2 124.474,36.2 ccw(c124.474,36.592) 124.866,36.592 124.866,37.239 cw(c125.021,37.239) 125.021,37.394 cw(c125.021,37.239) 125.176,37.239 125.176,36.044 ccw(c125.568,36.044) 125.568,35.652 ccw(c125.568,36.044) 125.96,36.044 125.96,36.712 cw(c126.115,36.712) 126.115,36.867 cw(c126.115,36.712) 126.27,36.712 126.27,36.592 ccw(c126.661,36.592) 126.661,36.2 127.039,36.2 127.375,35.864 129.535,33.704 140.071,33.704 140.168,33.607 140.168,33.516 139.158,32.506 J9.15@138.788,32.506
  BottomLayer w0.085: J9.15@138.788,32.506 139.948,33.666 140.018,33.666 140.13,33.554 142.754,33.554 143.044,33.844 143.731,33.844 143.78,33.794 143.78,33.697 R175.2@144.028,33.45
EEM_IO.LVDS_N13: IC4.AB22 J9.18 R176.2 | length 49.5
  TopLayer w0.085: IC4.AB22@110.998,43.95 v1(111.498,43.45)
  SignalLayer1 w0.11: v1(111.498,43.45) 111.181,43.45 111.116,43.386 111.116,43.284 113.45,40.95 114.662,40.95 115.444,40.168 115.531,40.081 115.566,40.046 ccw(c115.711,40.191) 115.856,40.046 116.216,40.406 ; 116.217,40.407 cw(c116.529,40.094) 116.842,40.407 cw(c116.529,40.094) 116.842,39.782 116.312,39.252 ccw(c116.458,39.108) 116.603,38.963 117.131,39.491 cw(c117.444,39.179) 117.757,39.492 cw(c117.444,39.179) 117.757,38.867 117.227,38.337 ccw(c117.373,38.193) 117.518,38.048 118.046,38.576 ; 118.047,38.577 cw(c118.359,38.264) 118.672,38.577 cw(c118.359,38.264) 118.672,37.952 118.311,37.591 ccw(c118.456,37.446) 118.311,37.301 119.347,36.265 119.435,36.177 119.725,35.887 120.188,35.887 122.438,33.637 125.988,33.637 128.338,31.287 139.838,31.287 140.177,30.948 140.177,30.3 140.428,30.049 141.245,30.049 J9.18@141.328,29.966
  BottomLayer w0.085: J9.18@141.328,29.966 141.255,30.039 140.45,30.039 140.164,30.325 140.164,30.689 140.569,31.094 143.731,31.094 143.78,31.044 143.78,30.947 R176.2@144.028,30.7
EEM_IO.LVDS_N14: IC4.AB20 J9.21 R177.2 | length 53.2
  TopLayer w0.085: IC4.AB20@108.998,43.95 v1(109.498,43.45)
  SignalLayer1 w0.11: v1(109.498,43.45) 109.127,43.821 109.036,43.821 108.972,43.756 108.972,43.46 109.212,43.22 109.212,42.638 109.9,41.95 109.9,40.95 110.15,40.7 110.189,40.661 110.416,40.434 ccw(c110.561,40.579) 110.706,40.434 110.818,40.545 cw(c110.963,40.4) 111.108,40.545 cw(c110.963,40.4) 111.108,40.255 110.996,40.144 ccw(c111.141,39.999) 110.996,39.854 111.286,39.564 111.325,39.525 120.438,30.412 122.511,30.412 123.625,29.298 123.625,27.95 127.85,23.725 139.4,23.725 139.986,24.311 139.986,25.442 140.113,25.569 140.113,25.859 140.049,25.923 139.825,25.923 J9.21@138.788,24.886
  BottomLayer w0.085: J9.21@138.788,24.886 139.971,26.069 140.275,26.069 140.41,25.934 141.3,25.934 ; 141.3,25.934 143.04,25.934 143.45,26.344 143.654,26.344 144.028,25.97 R177.2@144.028,25.95
EEM_IO.LVDS_N15: IC4.AB18 J9.24 R144.2 | length 53.4
  TopLayer w0.085: IC4.AB18@106.998,43.95 106.998,43.86 107.348,43.51 v1(107.348,43.425)
  SignalLayer1 w0.11: v1(107.348,43.425) 107.348,43.503 107.498,43.653 107.498,43.724 107.562,43.788 107.654,43.788 107.805,43.636 107.805,42.26 108.138,41.927 108.138,39.862 127.05,20.95 139.675,20.95 140.177,21.452 140.177,22.075 140.428,22.326 141.308,22.326 J9.24@141.328,22.346
  BottomLayer w0.085: J9.24@141.328,22.346 140.404,22.346 140.15,22.6 140.15,23.219 140.4,23.469 143.484,23.469 143.733,23.469 143.783,23.419 143.783,23.347 R144.2@144.03,23.1
EEM_IO.LVDS_P0: IC4.V18 IC27.19 | length 58.5
  TopLayer w0.085: IC4.V18@106.998,47.95 v1(107.498,47.45)
  SignalLayer1 w0.11: v1(147.574,46.474) 147.593,46.494 147.85,46.494 149.35,47.994 149.35,48.157 149.824,48.631 150.001,48.631 150.195,48.825 v1(150.223,48.825)
  BottomLayer w0.085: v1(107.498,47.45) 107.842,47.45 107.892,47.5 107.892,47.724 108.23,48.062 108.788,48.062 109.125,47.725 109.125,46.15 109.263,46.012 112.462,46.012 112.637,46.187 114.913,46.187 115.107,45.994 119.281,45.994 119.425,45.85 121.575,45.85 122.737,47.012 127.413,47.012 130.438,43.987 131.35,43.987 131.499,43.987 ccw(c131.499,44.18) 131.691,44.18 131.691,44.518 cw(c132.096,44.518) 132.096,44.923 cw(c132.096,44.518) 132.5,44.518 132.5,43.481 ccw(c132.693,43.481) 132.693,43.289 ccw(c132.693,43.481) 132.885,43.481 132.885,44.518 cw(c133.29,44.518) 133.29,44.923 cw(c133.29,44.518) 133.694,44.518 133.694,43.481 ccw(c133.887,43.481) 133.887,43.289 ccw(c133.887,43.481) 134.079,43.481 134.079,44.518 cw(c134.484,44.518) 134.484,44.923 cw(c134.484,44.518) 134.888,44.518 134.888,43.497 ccw(c135.081,43.497) 135.081,43.304 ccw(c135.081,43.497) 135.273,43.497 135.273,43.583 cw(c135.678,43.583) 135.678,43.987 136.455,43.987 144.849,43.987 146.212,45.35 146.724,45.35 147.399,46.026 147.57,46.197 147.57,46.471 v1(147.574,46.474) ; v1(150.223,48.825) 150.226,48.825 150.42,48.631 150.779,48.631 IC27.19@150.848,48.7
EEM_IO.LVDS_P1: IC4.P16 IC27.17 | length 67.3
  TopLayer w0.085: IC4.P16@104.998,51.95 v1(105.498,51.45)
  BottomLayer w0.085: v1(105.498,51.45) 105.888,51.06 105.958,51.06 106.07,51.172 106.316,51.172 106.398,51.09 110.335,51.09 110.425,51 110.525,50.9 112.925,50.9 113.325,50.5 113.325,49.612 113.594,49.344 117.356,49.344 118,48.7 120.525,48.7 121.95,50.125 126.85,50.125 129.916,53.191 130.384,53.659 cw(c130.634,53.408) 130.884,53.659 131.276,53.268 ccw(c131.376,53.369) 131.477,53.268 ccw(c131.376,53.369) 131.477,53.469 130.563,54.383 cw(c130.814,54.634) 130.563,54.885 cw(c130.814,54.634) 131.029,54.916 131.033,54.916 132.013,53.936 ccw(c132.114,54.037) 132.215,53.936 ccw(c132.114,54.037) 132.215,54.138 ; 131.266,55.588 ccw(c131.517,55.337) 131.267,55.085 132.214,54.138 ; 131.267,55.588 cw(c131.517,55.337) 131.732,55.619 131.736,55.619 132.716,54.639 ccw(c132.817,54.74) 132.918,54.639 ccw(c132.817,54.74) 132.918,54.84 ; 131.969,56.29 ccw(c132.22,56.04) 131.97,55.788 132.917,54.841 ; 131.97,56.291 cw(c132.22,56.04) 132.435,56.321 132.439,56.321 133.419,55.342 ccw(c133.52,55.442) 133.621,55.342 ccw(c133.52,55.442) 133.62,55.543 ; 133.62,55.544 133.196,55.968 cw(c133.446,56.219) 133.195,56.47 133.3,56.575 133.75,57.025 136.075,57.025 136.363,56.737 136.888,56.737 138.775,54.85 142.488,54.85 145.907,51.431 147.194,51.431 149.075,49.55 149.075,48.506 150.025,47.556 150.541,47.556 150.59,47.606 150.59,47.618 150.673,47.7 IC27.17@150.848,47.7
EEM_IO.LVDS_P2: IC4.R18 IC28.19 | length 65.3
  TopLayer w0.085: IC4.R18@106.998,50.95 v1(107.498,50.45)
  BottomLayer w0.085: v1(107.498,50.45) 107.498,50.106 107.548,50.056 108.782,50.056 109.1,49.738 109.1,49.225 109.207,49.118 110.756,49.118 111.381,48.494 112.331,48.494 112.488,48.337 114.288,48.337 115.25,47.375 116.925,47.375 117.625,48.075 121.125,48.075 122.637,49.587 128.087,49.587 129.99,51.49 130.041,51.541 130.968,51.541 ccw(c130.968,51.733) 131.16,51.733 cw(c131.565,51.733) 131.565,52.138 cw(c131.565,51.733) 131.969,51.733 131.969,50.739 ccw(c132.162,50.739) 132.162,50.546 ccw(c132.162,50.739) 132.354,50.739 132.354,52.306 cw(c132.759,52.306) 132.759,52.71 cw(c132.759,52.306) 133.163,52.306 133.163,50.739 ccw(c133.356,50.739) 133.356,50.546 ccw(c133.356,50.739) 133.548,50.739 133.548,52.306 cw(c133.953,52.306) 133.953,52.71 cw(c133.953,52.306) 134.357,52.306 134.357,50.739 ccw(c134.55,50.739) 134.55,50.546 ccw(c134.55,50.739) 134.742,50.739 134.742,51.136 cw(c135.147,51.136) 135.147,51.541 135.295,51.541 142.959,51.541 144.013,50.487 146.976,50.487 148.25,49.213 148.25,48.2 148.825,47.625 148.825,43.35 148.825,43.307 ccw(c148.917,43.307) 148.917,43.215 148.947,43.215 cw(c148.947,43.122) 149.04,43.122 cw(c148.947,43.122) 148.947,43.03 148.917,43.03 ccw(c148.917,42.937) 148.825,42.937 148.825,42.762 148.825,42.7 149.469,42.056 150.541,42.056 150.59,42.106 150.59,42.118 150.673,42.2 IC28.19@150.848,42.2
EEM_IO.LVDS_P3: IC4.V17 IC28.17 | length 58.1
  TopLayer w0.085: IC4.V17@105.998,47.95 v1(106.498,47.45)
  BottomLayer w0.085: v1(106.498,47.45) 106.498,47.106 106.548,47.056 107.819,47.056 108.075,46.8 108.075,45.275 108.232,45.118 108.807,45.118 109.166,44.759 109.166,44.184 109.325,44.025 114.525,44.025 115.425,44.925 121.7,44.925 123.137,46.362 125.288,46.362 126.812,44.838 126.812,42.628 129.746,39.694 129.746,36.754 130.15,36.35 144.625,36.35 149.331,41.056 150.541,41.056 150.59,41.106 150.59,41.118 150.673,41.2 IC28.17@150.848,41.2
EEM_IO.LVDS_P4: IC4.P19 IC29.19 | length 54.4
  TopLayer w0.085: IC4.P19@107.998,51.95 v1(108.498,51.45)
  SignalLayer1 w0.11: v1(108.498,51.45) 108.498,51.133 108.562,51.068 116.782,51.068 118.5,49.35 129.41,49.35 137.125,49.35 137.294,49.181 142.179,49.181 145.7,45.66 145.7,39.386 147.42,37.666 147.609,37.477 ccw(c147.718,37.586) 147.828,37.477 147.931,37.58 cw(c148.04,37.47) 148.15,37.58 cw(c148.04,37.47) 148.15,37.36 148.047,37.258 ccw(c148.157,37.148) 148.047,37.038 148.266,36.819 148.305,36.78 148.469,36.617 148.725,36.617 v1(148.745,36.597)
  BottomLayer w0.085: v1(148.745,36.597) 148.749,36.594 148.749,36.319 149.096,35.971 149.512,35.556 150.541,35.556 150.59,35.606 150.59,35.618 150.673,35.7 IC29.19@150.848,35.7
EEM_IO.LVDS_P5: IC4.P15 J8.17 R150.2 | length 80.2
  TopLayer w0.085: IC4.P15@103.998,51.95 v1(104.498,51.45)
  SignalLayer1 w0.11: v1(104.498,51.45) 104.869,51.079 105.095,51.079 105.135,51.119 106.654,51.119 107.066,50.707 107.066,50.284 107.3,50.05 110.39,50.05 110.858,50.518 112.105,50.518 112.761,49.862 114.088,49.862 114.588,49.362 117.113,49.362 117.938,48.537 128.023,48.537 129.919,46.641 142.519,46.641 143.787,45.373 143.787,40.288 144.625,39.45 144.625,35.525 149.738,30.412 151.588,30.412 153.125,28.875 154.45,28.875 154.505,28.875 ccw(c154.505,29.03) 154.66,29.03 154.66,29.25 cw(c154.815,29.25) 154.815,29.405 cw(c154.815,29.25) 154.97,29.25 154.97,29.03 ccw(c155.125,29.03) 155.125,28.875 ccw(c155.125,29.03) 155.28,29.03 155.28,29.25 cw(c155.435,29.25) 155.435,29.405 cw(c155.435,29.25) 155.59,29.25 155.59,29.03 ccw(c155.745,29.03) 155.745,28.875 155.984,28.875 156.475,28.875 158.645,28.875 158.71,28.939 158.71,29.903 158.645,29.967 J8.17@157.558,29.967
  BottomLayer w0.085: J8.17@157.558,29.967 158.592,29.967 158.788,30.163 158.788,31.063 158.975,31.25 160.65,31.25 161.456,32.056 161.913,32.056 161.963,32.106 161.963,32.203 R150.2@162.21,32.45
EEM_IO.LVDS_P6: IC4.U17 J8.20 R151.2 | length 74.9
  TopLayer w0.085: IC4.U17@105.998,48.95 v1(106.498,48.45)
  SignalLayer1 w0.11: v1(106.498,48.45) 106.815,48.45 106.88,48.514 106.88,48.797 107.195,49.112 108.748,49.112 109.066,48.794 109.066,48.151 109.13,48.087 110.863,48.087 112.688,46.262 114.638,46.262 115.963,44.937 118.163,44.937 121.438,41.662 126.923,41.662 129.648,38.937 142.373,38.937 143.475,37.835 143.475,33.1 144.287,32.287 144.375,32.2 144.41,32.165 ccw(c144.555,32.31) 144.7,32.165 144.999,32.464 ; 145,32.464 cw(c145.312,32.152) 145.625,32.464 cw(c145.312,32.152) 145.625,31.839 145.325,31.54 ccw(c145.47,31.395) 145.325,31.25 145.75,30.825 145.837,30.737 146.45,30.125 148.75,30.125 151.45,27.425 153.46,27.425 154.563,26.322 158.016,26.322 158.154,26.46 158.692,26.46 158.826,26.326 158.997,26.326 J8.20@160.098,27.427
  BottomLayer w0.085: J8.20@160.098,27.427 158.938,26.267 158.938,26.197 158.988,26.147 160.672,26.147 161.331,26.806 161.836,26.806 162.21,27.18 R151.2@162.21,27.2
EEM_IO.LVDS_P7: IC4.AA20 J8.23 R152.2 | length 73.3
  TopLayer w0.085: IC4.AA20@108.998,44.95 v1(109.498,44.45)
  SignalLayer1 w0.11: v1(109.498,44.45) 109.815,44.45 109.879,44.386 109.879,42.997 114.052,38.825 114.813,38.825 118.913,34.725 118.913,33.677 120.227,32.363 121.714,32.363 123.127,30.95 125.05,30.95 127.326,28.674 131.7,28.674 131.874,28.674 ccw(c131.874,29.116) 132.316,29.116 132.316,29.344 cw(c132.521,29.344) 132.521,29.549 cw(c132.521,29.344) 132.726,29.344 132.726,28.257 ccw(c133.168,28.257) 133.168,27.815 ccw(c133.168,28.257) 133.61,28.257 133.61,29.327 cw(c133.814,29.327) 133.814,29.532 cw(c133.815,29.327) 134.02,29.327 134.02,29.116 ccw(c134.461,29.116) 134.461,28.674 135.021,28.674 141.863,28.674 141.927,28.738 146.877,28.738 148.932,26.683 150.807,26.683 151.765,25.725 152.965,25.725 154.282,24.407 154.541,24.149 cw(c154.431,24.04) 154.541,23.93 154.483,23.873 ccw(c154.593,23.763) 154.483,23.654 ccw(c154.593,23.763) 154.703,23.654 154.76,23.711 cw(c154.869,23.601) 154.979,23.711 155.16,23.53 155.179,23.511 158.454,23.511 158.71,23.255 158.71,22.411 158.645,22.347 J8.23@157.558,22.347
  BottomLayer w0.085: J8.23@157.558,22.347 157.784,22.573 158.436,22.573 158.688,22.825 158.688,23.576 158.887,23.775 160.8,23.775 161.078,24.053 161.078,24.463 161.548,24.933 161.963,24.933 162.21,25.18 R152.2@162.21,25.2
EEM_IO.LVDS_P8: IC4.U20 J9.2 R153.2 | length 60.5
  TopLayer w0.085: IC4.U20@108.998,48.95 v1(109.498,48.45)
  BottomLayer w0.085: v1(109.498,48.45) 109.498,48.106 109.548,48.056 110.719,48.056 111.875,46.9 112.55,46.9 112.699,46.9 ccw(c112.699,47.042) 112.841,47.042 112.841,47.514 cw(c113.196,47.514) 113.196,47.869 cw(c113.196,47.514) 113.55,47.514 113.55,47.042 ccw(c113.693,47.042) 113.693,46.9 114.825,46.9 114.893,46.9 115.456,46.9 cw(c115.456,46.546) 115.81,46.546 115.81,46.533 ccw(c115.953,46.533) 115.953,46.391 ccw(c115.953,46.533) 116.096,46.533 116.096,46.624 cw(c116.45,46.624) 116.45,46.978 cw(c116.45,46.624) 116.804,46.624 116.804,46.533 ccw(c116.947,46.533) 116.947,46.391 ccw(c116.947,46.533) 117.089,46.533 117.089,46.688 cw(c117.444,46.688) 117.444,47.042 cw(c117.444,46.688) 117.798,46.688 117.798,46.533 ccw(c117.941,46.533) 117.941,46.391 ccw(c117.941,46.533) 118.083,46.533 118.083,47.323 cw(c118.438,47.323) 118.438,47.678 cw(c118.438,47.323) 118.792,47.323 118.792,46.533 ccw(c118.935,46.533) 118.935,46.391 ccw(c118.935,46.533) 119.077,46.533 119.077,47.323 cw(c119.432,47.323) 119.432,47.678 cw(c119.432,47.323) 119.786,47.323 119.786,46.389 ccw(c119.929,46.389) 119.929,46.247 ccw(c119.929,46.389) 120.071,46.389 120.071,47.323 cw(c120.426,47.323) 120.426,47.678 cw(c120.426,47.323) 120.78,47.323 120.78,46.389 ccw(c120.923,46.389) 120.923,46.247 ccw(c120.923,46.389) 121.065,46.389 121.065,46.621 cw(c121.596,46.621) 121.218,46.992 cw(c121.596,46.621) 121.22,46.995 121.444,47.219 122.408,48.183 122.512,48.287 122.86,48.287 ccw(c122.86,48.429) 123.002,48.429 123.002,48.836 cw(c123.357,48.836) 123.357,49.19 cw(c123.357,48.836) 123.711,48.836 123.711,48.098 ccw(c123.854,48.098) 123.854,47.956 ccw(c123.854,48.098) 123.996,48.098 123.996,48.836 cw(c124.351,48.836) 124.351,49.19 cw(c124.351,48.836) 124.705,48.836 124.705,48.098 ccw(c124.848,48.098) 124.848,47.956 ccw(c124.848,48.098) 124.99,48.098 124.99,48.836 cw(c125.345,48.836) 125.345,49.19 cw(c125.345,48.836) 125.699,48.836 125.699,48.098 ccw(c125.842,48.098) 125.842,47.956 ccw(c125.842,48.098) 125.984,48.098 125.984,48.836 cw(c126.339,48.836) 126.339,49.19 cw(c126.339,48.836) 126.693,48.836 126.693,48.098 ccw(c126.836,48.098) 126.836,47.956 ccw(c126.836,48.098) 126.978,48.098 126.978,48.836 cw(c127.333,48.836) 127.333,49.19 cw(c127.333,48.836) 127.687,48.836 127.687,48.429 ccw(c127.83,48.429) 127.83,48.287 128.362,48.287 128.475,48.4 129.287,49.212 140.254,49.212 J9.2@141.328,50.286 141.328,49.883 140.745,49.3 140.745,49.23 140.888,49.087 142.601,49.087 142.95,48.738 142.95,48.556 143.2,48.306 143.731,48.306 143.78,48.356 143.78,48.453 R153.2@144.028,48.7